# Altium PCB main.PcbDoc (part 2 of 2)
Units mm, origin at the board's own origin, x right, y up, seen from the top; angles counter-clockwise.
Board outline 90 x 95 mm, 4 copper layers (Top L1, GND L2, CLK L3, Bot GND L4), stack 1.59 mm thick; 88 components, 60 nets, 501 pads, 675 vias.
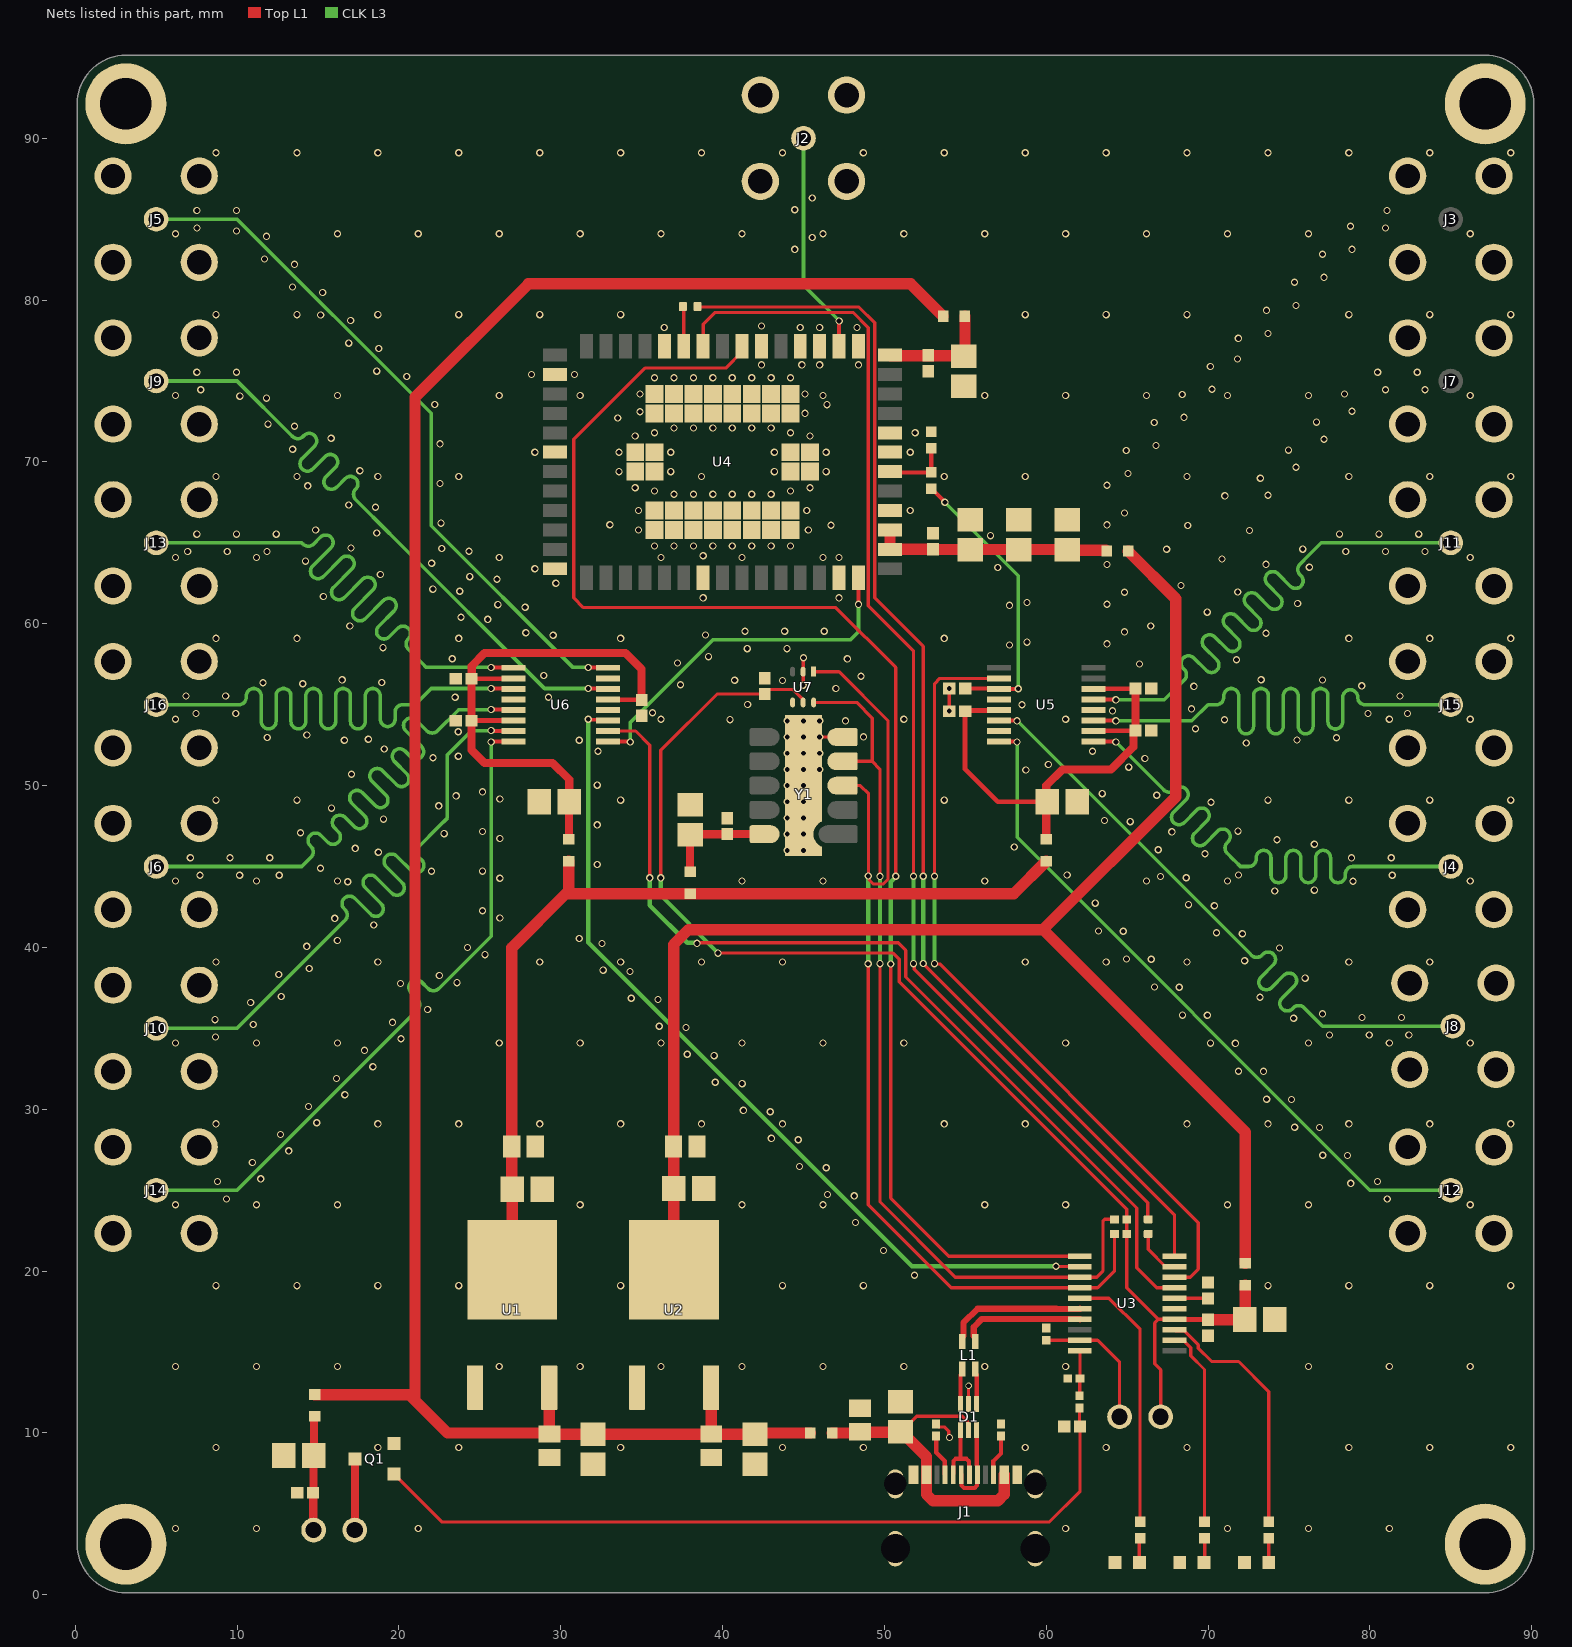
[diagram p4: the nets of this part, all layers, seen from the top]

## Via types
v1: diameter 0.45, hole 0.3, Top L1 to Bot GND L4, tented both sides, 674 vias
v2: diameter 0.4, hole 0.3, Top L1 to Bot GND L4, tented both sides, 1 vias

## Nets (pads, with @x,y where several pads share a name; then routed paths per layer and width w, separated by ;. In a path a pad name is that pad's centre, name@x,y a point inside that pad or via, vN(x,y) a via of type N, cw(c..) or ccw(c..) an arc to the next point about the centre after c; other vN are vias at no path point) (continued)
10MHz_3: J11.1 U5.13 | length 41.8
  Top L1 w0.248: U5.13@62.921,55.325 62.933,55.312 64.288,55.312 v1(64.3,55.3)
  CLK L3 w0.22: v1(64.3,55.3) 67.3,55.3 68.45,56.45 68.528,56.528 ccw(c68.203,56.853) 68.528,57.178 68.471,57.235 cw(c68.796,57.56) 68.471,57.885 cw(c68.796,57.56) 69.121,57.885 69.885,57.121 ccw(c70.21,57.446) 70.535,57.121 ccw(c70.21,57.446) 70.535,57.771 69.771,58.535 cw(c70.097,58.86) 69.771,59.186 cw(c70.097,58.86) 70.422,59.186 71.186,58.422 ccw(c71.511,58.747) 71.836,58.422 ccw(c71.511,58.747) 71.836,59.072 71.072,59.836 cw(c71.397,60.161) 71.072,60.486 cw(c71.397,60.161) 71.722,60.486 72.486,59.722 ccw(c72.811,60.047) 73.136,59.722 ccw(c72.811,60.047) 73.136,60.372 72.373,61.136 cw(c72.698,61.462) 72.373,61.787 cw(c72.698,61.462) 73.023,61.787 73.787,61.023 ccw(c74.112,61.348) 74.437,61.023 ccw(c74.112,61.348) 74.437,61.673 73.673,62.437 cw(c73.998,62.762) 73.673,63.087 cw(c73.998,62.762) 74.323,63.087 75.087,62.323 ccw(c75.412,62.648) 75.738,62.323 ccw(c75.412,62.648) 75.738,62.974 75.681,63.03 cw(c76.006,63.356) 75.681,63.681 76.2,64.2 77,65 J11.1@85,65
10MHz_4: J15.1 U5.11 | length 42.2
  Top L1 w0.248: U5.11@62.921,54.025 62.934,54.012 64.288,54.012 v1(64.3,54)
  CLK L3 w0.22: v1(64.3,54) 69,54 70,55 70.4,55 70.51,55 ccw(c70.51,55.46) 70.97,55.46 70.97,55.54 cw(c71.429,55.54) 71.889,55.54 71.889,53.662 ccw(c72.349,53.662) 72.809,53.662 72.809,55.54 cw(c73.269,55.54) 73.729,55.54 73.729,53.662 ccw(c74.188,53.662) 74.648,53.662 74.648,55.54 cw(c75.108,55.54) 75.568,55.54 75.568,53.662 ccw(c76.028,53.662) 76.487,53.662 76.487,55.54 cw(c76.947,55.54) 77.407,55.54 77.407,53.954 ccw(c77.867,53.954) 78.327,53.954 78.327,55.46 cw(c78.787,55.46) 79.246,55.46 ccw(c79.706,55.46) 79.706,55 80.6,55 J15.1@85,55
10MHz_5: J4.1 U5.9 | length 42.1
  Top L1 w0.248: U5.9@62.921,52.725 62.934,52.712 64.288,52.712 v1(64.3,52.7)
  CLK L3 w0.22: v1(64.3,52.7) 67.2,49.8 67.278,49.722 ccw(c67.603,50.047) 67.928,49.722 67.985,49.779 cw(c68.31,49.454) 68.635,49.779 cw(c68.31,49.454) 68.635,49.129 67.871,48.365 ccw(c68.196,48.04) 67.871,47.715 ccw(c68.196,48.04) 68.521,47.715 69.285,48.479 cw(c69.61,48.153) 69.936,48.479 cw(c69.61,48.153) 69.936,47.828 69.172,47.064 ccw(c69.497,46.739) 69.172,46.414 ccw(c69.497,46.739) 69.822,46.414 70.586,47.178 cw(c70.911,46.853) 71.236,47.178 cw(c70.911,46.853) 71.236,46.528 71.179,46.471 ccw(c71.504,46.146) 71.179,45.821 71.572,45.428 71.65,45.35 72,45 72.4,45 72.51,45 ccw(c72.51,45.46) 72.97,45.46 72.97,45.54 cw(c73.429,45.54) 73.889,45.54 73.889,44.46 ccw(c74.349,44.46) 74.809,44.46 74.809,45.54 cw(c75.269,45.54) 75.729,45.54 75.729,44.46 ccw(c76.188,44.46) 76.648,44.46 76.648,45.54 cw(c77.108,45.54) 77.568,45.54 77.568,44.46 ccw(c78.028,44.46) 78.487,44.46 78.487,44.54 cw(c78.947,44.54) 78.947,45 80.4,45 J4.1@85,45
10MHz_6: J8.1 U5.6 | length 41.9
  Top L1 w0.248: U5.6@57.079,54.025 57.092,54.012 58.188,54.012 v1(58.2,54)
  CLK L3 w0.22: v1(58.2,54) 72.6,39.6 72.678,39.522 ; 72.678,39.522 ccw(c73.003,39.847) 73.328,39.522 73.385,39.579 cw(c73.71,39.254) 74.035,39.579 cw(c73.71,39.254) 74.035,38.929 73.271,38.165 ccw(c73.596,37.84) 73.271,37.515 ccw(c73.596,37.84) 73.921,37.515 74.685,38.279 cw(c75.01,37.953) 75.336,38.279 cw(c75.01,37.953) 75.336,37.628 74.572,36.864 ccw(c74.897,36.539) 74.572,36.214 ccw(c74.897,36.539) 75.222,36.214 75.279,36.271 cw(c75.604,35.946) 75.929,36.271 76.672,35.528 76.75,35.45 77.073,35.127 J8.1@85.127,35.127
10MHz_7: J12.1 U5.8 | length 42.9
  Top L1 w0.248: U5.8@57.079,52.725 57.092,52.712 58.188,52.712 v1(58.2,52.7)
  CLK L3 w0.22: v1(58.2,52.7) 58.2,46.8 80,25 J12.1@85,25
10MHz_EN: U3.8 U5.2 | length 48.9
  Top L1 w0.2: v1(53.1,39) 53.121,38.979 53.421,38.979 69.4,23 69.4,20.124 68.901,19.625 U3.8@67.921,19.625 ; v1(53.1,44.4) 53.1,56.3 53.425,56.625 U5.2@57.079,56.625
  CLK L3 w0.254: v1(53.1,39) v1(53.1,44.4)
10MHz_ref: C25.1 R4.2 U5.3 | length 17.9
  Top L1 w0.248: R4.2@52.897,68.351 53.737,67.511 v1(53.737,67.504) ; C25.1@54.99,56 55.003,55.987 57.067,55.987 U5.3@57.079,55.975 57.085,55.981 58.263,55.981 v1(58.269,55.986)
  CLK L3 w0.22: v1(53.737,67.504) 58.269,62.972 v1(58.269,55.986)
10MHzOut_3V3: C21.1 C22.1 C26.1 C27.1 FB3.2 U5.5 U5.10 U5.14 | length 30.3
  Top L1 w0.3: U5.5@57.079,54.675 57.052,54.648 55.038,54.648 C22.1@54.99,54.6 54.99,51.01 57,49 C21.1@60.074,49 ; U5.10@62.921,53.375 62.933,53.387 65.497,53.387 C27.1@65.51,53.4 ; U5.14@62.921,55.975 62.933,55.987 65.497,55.987 C26.1@65.51,56
  Top L1 w0.5: FB3.2@60,46.675 60,48.926 C21.1@60.074,49 60,49.074 60,50 61,51 64,51 65.38,52.38 65.38,53.29 65.49,53.4 C27.1@65.51,53.4 C26.1@65.51,56
ANT_5V: C17.1 C18.1 FB7.2 U4.54 | length 7.1
  Top L1 w0.7: U4.54@50.35,76.6 50.387,76.563 54.863,76.563 C17.1@54.9,76.526 54.975,76.601 FB7.2@54.975,79
CLK_3V3: C2.1 C6.1 FB2.1 FB3.1 FB4.1 U1.2 | length 57.2
  Top L1 w0.7: U1.2@27,20.075 27.003,20.078 27.003,24.7 26.974,24.729 26.974,39.974 30.325,43.325 ; FB4.1@30.5,45.325 30.5,43.5 30.325,43.325 ; FB3.1@60,45.325 58,43.325 FB2.1@38,43.325 30.325,43.325
D_N: L1.3 U3.16 | length 8.8
  Top L1 w0.381: L1.3@54.8,15.65 54.8,15.9 54.882,15.983 54.882,16.804 55.754,17.676 60.633,17.676 60.641,17.668 62.071,17.668 U3.16@62.079,17.675
D_P: L1.2 U3.17 | length 7.7
  Top L1 w0.381: L1.2@55.6,15.65 55.6,15.9 55.517,15.983 55.517,16.541 56.018,17.041 60.37,17.041 60.378,17.033 62.071,17.033 U3.17@62.079,17.025
DIG_3V3: C4.1 C10.1 FB5.1 FB6.1 U2.2 | length 97.1
  Top L1 w0.5: FB5.1@65.075,64.475 FB5.1@65.075,64.5
  Top L1 w0.7: U2.2@37,20.075 36.974,20.101 C4.1@36.974,25.1 C10.1@36.974,27.7 36.974,40.174 37.9,41.1 59.8,41.1 ; FB5.1@65.075,64.475 68,61.55 68,49.3 59.8,41.1 ; FB6.1@72.3,20.475 72.3,28.6 59.8,41.1
GND: C1.2 C2.2 C3.2 C4.2 C5.2 C6.2 C7.2 C8.2 C9.2 C10.2 C11.2 C12.2 C13.2 C14.2 C15.2 C16.2 C17.2 C18.2 C19.2 C20.1 C21.2 C22.2 C23.2 C24.2 C25.2 C26.2 C27.2 C28.2 C29.2 C30.2 C31.2 C32.2 C33.2 C34.2 D1.2 DS1.2 DS2.2 DS3.2 J1.1 J1.2 J1.3 J1.4 J1.A1-B12 J1.B1-A12 J2.2 J2.3 J2.4 J2.5 J3.2 J3.3 J3.4 J3.5 J4.2 J4.3 J4.4 J4.5 J5.2 J5.3 J5.4 J5.5 J6.2 J6.3 J6.4 J6.5 J7.2 J7.3 J7.4 J7.5 J8.2 J8.3 J8.4 J8.5 J9.2 J9.3 J9.4 J9.5 J10.2 J10.3 J10.4 J10.5 J11.2 J11.3 J11.4 J11.5 J12.2 J12.3 J12.4 J12.5 J13.2 J13.3 J13.4 J13.5 J14.2 J14.3 J14.4 J14.5 J15.2 J15.3 J15.4 J15.5 J16.2 J16.3 J16.4 J16.5 pad.GND Q1.2 R1.2 R2.2 R5.1 R9.2 R14.2 U1.1 U2.1 U3.5 U4.1 U4.3 U4.4 U4.6 U4.11 U4.17 U4.21 U4.27 U4.34 U4.41 U4.46 U4.49 U4.50 U4.G01 U5.4 U5.7 U5.12 U6.4 U6.7 U6.12 U7.2 U7.4 Y1.5 Y1.11 | length 7.2
  Top L1 w0.2: v1(44.978,56.205) 44.989,56.216 44.989,57.889 v1(45,57.9) ; v1(46,53) Y1.5@47.6,53 ; R1.2@53.2,10.55 53.2,10.525 53.35,10.375 53.699,10.375 53.973,10.101 53.973,9.762 v1(54.021,9.714) ; v1(54.01,54.6) v1(54.01,56) ; D1.2@55.2,11.8 v2(55.199,12.916)
  other v1: 6.2,4.1 11.2,4.1 21.2,4.1 61.2,4.1 71.2,4.1 76.2,4.1 81.2,4.1 8.7,9.1 18.7,9.1 23.7,9.1 33.7,9.1 43.7,9.1 48.7,9.1 58.7,9.1 63.7,9.1 68.7,9.1 78.7,9.1 83.7,9.1 88.7,9.1 6.2,14.1 11.2,14.1 16.2,14.1 26.2,14.1 31.2,14.1 36.2,14.1 41.2,14.1 46.2,14.1 51.2,14.1 56.2,14.1 61.2,14.1 76.2,14.1 81.2,14.1 86.2,14.1 8.7,19.1 13.7,19.1 18.7,19.1 23.7,19.1 33.7,19.1 43.7,19.1 48.7,19.1 73.7,19.1 78.7,19.1 83.7,19.1 88.7,19.1 51.861,19.743 49.946,21.271 48.214,23.004 6.2,24.1 11.2,24.1 16.2,24.1 31.2,24.1 41.2,24.1 46.2,24.1 56.2,24.1 61.2,24.1 71.2,24.1 76.2,24.1 86.2,24.1 9.347,24.461 81.068,24.461 48.14,24.652 46.481,24.736 78.815,25.423 8.794,25.539 80.468,25.539 11.462,25.699 46.407,26.384 44.749,26.468 10.947,26.709 77.082,27.155 78.617,27.145 13.194,27.432 44.675,28.116 43.016,28.201 12.679,28.442 75.35,28.888 76.885,28.877 8.7,29.1 18.7,29.1 23.7,29.1 28.7,29.1 33.7,29.1 38.7,29.1 43.7,29.1 53.7,29.1 58.7,29.1 68.7,29.1 73.7,29.1 78.7,29.1 83.7,29.1 88.7,29.1 14.926,29.164 42.942,29.849 41.284,29.933 14.412,30.174 75.153,30.61 73.617,30.62 16.659,30.896 41.21,31.581 39.551,31.666 16.144,31.906 73.42,32.342 71.885,32.353 18.391,32.629 39.478,33.314 37.819,33.398 17.877,33.639 70.153,34.085 71.688,34.075 6.2,34.1 11.2,34.1 16.2,34.1 26.2,34.1 31.2,34.1 36.2,34.1 41.2,34.1 46.2,34.1 51.2,34.1 61.2,34.1 76.2,34.1 81.2,34.1 86.2,34.1 20.124,34.361 8.674,34.461 77.508,34.588 79.958,34.588 82.408,34.588 37.745,35.046 36.087,35.13 10.998,35.236 19.609,35.371 8.631,35.539 75.287,35.622 79.505,35.666 81.955,35.666 68.42,35.818 69.955,35.807 77.066,35.896 21.776,36.17 10.839,36.601 36.013,36.778 34.354,36.863 73.21,36.921 12.731,36.968 66.688,37.55 68.223,37.539 20.102,37.771 23.585,37.823 75.996,38.1 22.502,38.264 12.571,38.334 34.28,38.511 32.622,38.595 14.463,38.701 8.7,39.1 18.7,39.1 28.7,39.1 33.7,39.1 38.7,39.1 43.7,39.1 58.7,39.1 63.7,39.1 68.7,39.1 78.7,39.1 83.7,39.1 72.259,39.179 66.49,39.272 64.955,39.282 25.317,39.555 74.409,39.967 24.234,39.996 14.304,40.066 32.548,40.243 16.196,40.433 31.143,40.549 72.12,40.842 70.526,40.911 64.758,41.004 63.223,41.015 18.45,41.391 16.036,41.799 26.239,41.825 25.161,42.264 70.388,42.574 68.794,42.644 63.026,42.737 74.118,43.49 76.567,43.538 16.839,44.056 6.2,44.1 11.2,44.1 16.2,44.1 41.2,44.1 46.2,44.1 56.2,44.1 66.2,44.1 71.2,44.1 78.954,44.092 86.2,44.1 26.239,44.275 68.656,44.307 67.061,44.376 7.709,44.461 10.159,44.461 12.609,44.461 81.376,44.461 61.293,44.469 71.876,44.477 22.01,44.712 25.161,44.714 15.161,44.896 32.257,45.126 7.116,45.539 9.566,45.539 12.016,45.539 78.866,45.534 81.316,45.539 69.809,45.793 18.729,45.881 44,46 45,46 66.923,46.039 17.305,46.12 58.026,46.212 76.566,46.377 74.264,46.656 26.239,46.725 44,47 45,47 22.795,47.033 13.917,47.084 67.763,47.142 25.161,47.164 71.851,47.187 32.257,47.576 65.191,47.771 63.597,47.841 19.045,47.925 44,48 45,48 15.836,48.607 22.461,48.748 70.176,48.975 44,49 45,49 8.7,49.1 13.7,49.1 33.7,49.1 53.7,49.1 73.7,49.1 78.7,49.1 83.7,49.1 88.7,49.1 26.239,49.175 23.539,49.367 66.831,49.407 63.458,49.504 25.161,49.614 44,50 45,50 32.257,50.026 17.069,50.7 58.739,50.96 44,51 45,51 46,51 65.098,51.139 60.132,51.306 66.094,51.669 22.106,51.721 23.675,51.813 44,52 45,52 46,52 32.304,52.121 62.853,52.121 19.096,52.266 72.358,52.634 16.631,52.803 31.143,52.799 75.496,52.818 18.114,52.861 77.942,52.96 11.867,52.976 44,53 45,53 48.707,53.012 14.312,53.122 23.668,53.33 69.219,53.509 44,54 45,54 46,54 47.6,54 40.461,54.077 71.021,54.072 6.2,54.1 36.2,54.1 51.2,54.1 61.2,54.1 81.2,54.1 86.2,54.1 7.468,54.461 9.918,54.461 79.879,54.461 82.329,54.461 35.664,54.502 64.089,54.617 68.979,54.741 58.5,55 41.55,55.009 23.475,55.461 29.25,55.461 6.846,55.539 9.296,55.539 81.862,55.539 47,56 69.122,56.132 79.492,56.163 37.396,56.234 14.056,56.294 11.607,56.353 18.938,56.371 43.7,56.5 40.747,56.51 16.494,56.536 73.277,56.537 77.07,56.53 48.551,56.753 28.953,56.809 65.757,57.519 37.212,57.575 71.756,57.781 23.293,57.839 47.711,57.831 39.129,57.967 41.528,58.461 43.978,58.461 19.022,58.524 57.73,58.688 63.761,58.76 58.808,58.865 8.7,59.1 13.7,59.1 23.7,59.1 33.7,59.1 53.7,59.1 78.7,59.1 83.7,59.1 88.7,59.1 29.531,59.287 38.945,59.307 73.581,59.414 27.847,59.447 64.839,59.498 41.384,59.539 43.834,59.539 46.284,59.539 16.971,59.863 66.461,59.866 25.488,60.274 23.832,60.405 69.946,60.718 27.799,61.019 57.73,61.138 26.114,61.179 63.761,61.21 75.536,61.256 58.808,61.315 38.8,61.6 47.2,61.6 15.333,61.685 64.839,61.948 71.833,61.958 23.756,62.006 22.1,62.138 68.322,62.364 29.7,62.5 26.066,62.752 24.382,62.912 18.854,63.042 28.4,63.4 57.001,63.478 76.257,63.494 63.761,63.66 73.586,63.67 22.023,63.739 14.223,63.869 70.861,64.005 6.2,64.1 11.2,64.1 26.2,64.1 36.2,64.1 41.2,64.1 46.2,64.1 47.2,64.1 86.2,64.1 38.8,64.2 6.945,64.461 9.395,64.461 11.845,64.461 78.508,64.461 80.958,64.461 83.408,64.461 24.334,64.484 67.44,64.602 75.848,64.61 22.65,64.644 17.034,64.682 35.8,64.8 37,64.8 38.2,64.8 39.4,64.8 40.6,64.8 41.8,64.8 43,64.8 44.2,64.8 56.56,65.443 7.518,65.539 9.968,65.539 12.418,65.539 78.115,65.539 80.565,65.539 83.015,65.539 18.635,65.603 72.561,65.769 14.854,65.799 34.8,65.8 45.3,65.8 68.746,66.075 46.706,66.09 33.036,66.119 63.761,66.11 22.602,66.217 64.839,66.848 34.8,67 45.2,67 51.6,67 18.559,67.204 16.906,67.338 71.039,67.903 73.7,67.938 37,68 38.2,68 39.4,68 40.6,68 41.8,68 43,68 35.8,68.2 44.2,68.2 34.6,68.4 45.4,68.4 14.369,68.52 63.761,68.56 22.539,68.666 73.232,68.995 8.7,69.1 13.7,69.1 18.7,69.1 23.7,69.1 38.7,69.1 53.7,69.1 58.7,69.1 68.7,69.1 78.7,69.1 83.7,69.1 88.7,69.1 65.052,69.289 33.6,69.4 36.8,69.4 43.2,69.4 46.4,69.4 17.588,69.453 75.433,69.671 28.4,70.6 33.6,70.6 36.8,70.6 43.2,70.6 46.4,70.6 51.6,70.6 64.943,70.706 74.965,70.727 13.435,70.785 66.784,71.022 22.539,71.116 77.165,71.403 15.813,71.463 34.6,71.6 45.4,71.6 35.8,71.8 44.2,71.8 51.9,71.8 37,72.1 38.2,72.1 39.4,72.1 40.6,72.1 41.8,72.1 43,72.1 13.556,72.207 11.905,72.333 66.676,72.438 76.697,72.46 33.522,72.711 68.516,72.754 45.1,73 34.9,73.1 78.898,73.135 22.218,73.545 46.449,73.539 11.823,73.939 10.173,74.065 6.2,74.1 16.2,74.1 26.2,74.1 31.2,74.1 46.2,74.1 56.2,74.1 61.2,74.1 66.2,74.1 71.2,74.1 76.2,74.1 86.2,74.1 68.408,74.17 34.9,74.2 45.1,74.2 78.43,74.192 7.755,74.461 80.958,74.461 83.408,74.461 70.249,74.486 35.8,75.2 37,75.2 38.2,75.2 39.4,75.2 40.6,75.2 41.8,75.2 43,75.2 44.2,75.2 20.485,75.277 28.2,75.4 30.85,75.408 7.518,75.539 9.968,75.539 80.476,75.539 82.926,75.539 18.629,75.608 70.141,75.903 42.4,76 44.9,76 46,76 48.4,76 71.824,76.363 18.753,77.01 16.897,77.341 71.873,77.635 73.7,77.938 36.4,78.3 44.8,78.3 46,78.3 48.3,78.3 42.4,78.4 17.02,78.742 15.164,79.073 8.7,79.1 13.7,79.1 18.7,79.1 23.7,79.1 28.7,79.1 33.7,79.1 58.7,79.1 63.7,79.1 68.7,79.1 78.7,79.1 83.7,79.1 88.7,79.1 73.605,79.368 75.433,79.671 15.288,80.474 13.432,80.806 75.338,81.1 77.165,81.403 13.556,82.207 11.7,82.538 77.07,82.832 44.461,83.134 78.898,83.135 45.539,83.861 11.823,83.939 6.2,84.1 16.2,84.1 21.2,84.1 26.2,84.1 31.2,84.1 36.2,84.1 41.2,84.1 46.2,84.1 51.2,84.1 56.2,84.1 61.2,84.1 66.2,84.1 71.2,84.1 76.2,84.1 86.2,84.1 9.967,84.271 7.525,84.461 80.958,84.461 78.803,84.565 7.518,85.539 9.968,85.539 81.051,85.539 44.461,85.584 45.539,86.311 8.7,89.1 13.7,89.1 18.7,89.1 23.7,89.1 28.7,89.1 33.7,89.1 38.7,89.1 43.7,89.1 48.7,89.1 53.7,89.1 58.7,89.1 63.7,89.1 68.7,89.1 73.7,89.1 78.7,89.1 83.7,89.1 88.7,89.1
GPS_3V3: C13.1 C14.1 C15.1 C16.1 FB5.2 U4.44 U4.45 | length 14.6
  Top L1 w0.5: C16.1@52.995,64.605 C16.1@53,64.61 C16.1@53.018,64.592 ; C15.1@61.282,64.592 C15.1@61.3,64.574 C15.1@61.337,64.537 ; FB5.2@63.688,64.537 FB5.2@63.725,64.5
  Top L1 w0.7: U4.44@50.35,64.6 U4.45@50.35,65.8 ; U4.44@50.355,64.605 C16.1@52.995,64.605 ; C16.1@53.018,64.592 C15.1@61.282,64.592 ; C15.1@61.337,64.537 FB5.2@63.688,64.537
GPS_ANT: J2.1 U4.2 | length 13.7
  Top L1 w0.248: U4.2@47.204,77.166 v1(47.204,78.714)
  CLK L3 w0.22: J2.1@45,90 45,80.918 v1(47.204,78.714)
GPS_nRST: U3.11 U4.7 | length 90.6
  Top L1 w0.2: U4.7@41.2,77.15 41.2,76.8 40.2,75.8 35.2,75.8 30.8,71.4 30.8,61.6 31.4,61 47,61 50.7,57.3 v1(50.7,44.4) ; v1(50.391,38.981) 50.391,24.509 53.975,20.925 U3.11@62.079,20.925
  CLK L3 w0.254: v1(50.391,38.981) 50.391,44.038 50.7,44.347 v1(50.7,44.4)
GPS_UART_RXD: R3.1 U4.9 | length 74.5
  Top L1 w0.2: U4.9@38.8,77.15 38.8,78.5 39.539,79.239 48.061,79.239 49,78.3 49,61.1 51.8,58.3 v1(51.8,44.4) ; v1(51.8,39) 51.848,38.952 51.848,38.652 66.267,24.233 66.267,23.233 R3.1@66.3,23.2
  CLK L3 w0.254: v1(51.8,39) v1(51.8,44.4)
GPS_UART_TXD: R6.2 U3.10 | length 76.7
  Top L1 w0.2: R6.2@38.45,79.6 38.475,79.575 48.425,79.575 49.4,78.6 49.4,61.6 52.4,58.6 v1(52.4,44.4) ; v1@52.401,38.999 67.921,23.479 U3.10@67.921,20.925
  CLK L3 w0.254: v1(52.401,39.001) v1(52.4,44.4)
heater_CTL: R13.2 R14.1 U3.20 | length 2.8
  Top L1 w0.2: R13.2@62.056,12.295 62.069,12.308 62.069,13.339 R14.1@62.081,13.352 62.081,15.073 U3.20@62.079,15.075
heater_PWR: C31.1 C34.1 FB8.2 J18.1 | length 7.1
  Top L1 w0.5: J18.1@14.73,4 14.71,4.02 14.71,6.282 14.728,6.3 14.728,8.598 C31.1@14.726,8.6 14.763,8.637 14.763,10.988 FB8.2@14.8,11.025
heater_return: J18.2 Q1.3 | length 4.4
  Top L1 w0.5: J18.2@17.27,4 17.285,4.015 17.285,8.385 Q1.3@17.3,8.4
IN_5V: C1.1 C3.1 C5.1 C9.1 FB1.2 FB7.1 FB8.1 U1.3 U2.3 | length 135.8
  Top L1 w0.7: FB8.1@14.808,12.367 20.633,12.367 21,12 ; U1.3@29.29,12.8 29.295,12.795 29.295,9.931 C9.1@29.3,9.926 ; U2.3@39.29,12.8 39.295,12.795 39.295,9.931 C5.1@39.3,9.926 ; FB1.2@45.425,10 42.074,10 C1.1@42,9.926 C5.1@39.3,9.926 ; FB7.1@53.625,79 51.625,81 28,81 21,74 21,12 ; 21,12 23,10 29.226,10 C9.1@29.3,9.926 ; C9.1@29.3,9.926 C3.1@32,9.926 C5.1@39.3,9.926
LED1: R10.2 U3.15 | length 16.4
  Top L1 w0.2: U3.15@62.079,18.325 63.875,18.325 65.8,16.4 R10.2@65.8,4.5
LED2: R11.2 U3.2 | length 12.3
  Top L1 w0.2: U3.2@67.921,15.725 68.475,15.725 68.926,15.274 68.926,14.774 69.779,13.921 R11.2@69.779,4.507
LED3: R12.2 U3.3 | length 15.6
  Top L1 w0.2: U3.3@67.921,16.375 67.998,16.298 68.552,16.298 68.552,16.286 69.4,15.438 69.4,15.227 70.214,14.413 71.887,14.413 73.752,12.549 R12.2@73.752,4.507
MCU_3V3: C11.1 C12.1 C32.1 FB6.2 J17.2 R7.2 R8.2 U3.4 U7.5 | length 78.8
  Top L1 w0.2: v1(36.183,44.297) 36.183,52.183 39.657,55.657 C32.1@42.601,55.657 ; v1@39.721,39.652 50.536,39.652 50.922,39.266 50.922,37.878 64.975,23.825 R7.2@64.975,23.2 R8.2@64.975,22.3 64.975,18.975 66.925,17.025 ; C32.1@42.601,55.677 42.861,55.937 44.335,55.937 44.975,55.297 U7.5@44.975,55.137 ; J17.2@67.07,11 67.07,13.894 66.7,14.264 66.7,16.8 66.925,17.025 ; U3.4@67.921,17.025 66.925,17.025
  Top L1 w0.3: U3.4@67.921,17.025 67.939,17.007 69.982,17.007 C12.1@70,16.99
  Top L1 w0.7: C12.1@70,16.99 70.005,16.995 72.269,16.995 72.3,17.026 FB6.2@72.3,19.125
  CLK L3 w0.254: v1(36.183,44.297) 36.183,43.198 39.718,39.663 v1(39.718,39.649)
NetC30_1: C30.1 U3.6 | length 2.1
  Top L1 w0.2: U3.6@67.921,18.325 69.985,18.325 C30.1@70,18.31
NetC33_1: C33.1 Q1.1 R13.1 | length 49.6
  Top L1 w0.2: Q1.1@19.7,7.45 22.65,4.5 60.2,4.5 62.09,6.39 C33.1@62.09,10.4 62.056,10.434 R13.1@62.056,11.545
NetD1_1: D1.1 L1.1 | length 2.2
  Top L1 w0.26: L1.1@55.6,13.95 55.6,13.7 55.7,13.6 D1.1@55.7,11.8
NetD1_3: D1.3 L1.4 | length 2.2
  Top L1 w0.26: D1.3@54.7,11.8 54.7,13.6 54.8,13.7 L1.4@54.8,13.95
NetDS1_1: DS1.1 R10.1 | length 1.5
  Top L1 w0.2: DS1.1@65.75,2 65.75,3.45 R10.1@65.8,3.5
NetDS2_1: DS2.1 R11.1 | length 1.5
  Top L1 w0.2: DS2.1@69.75,2 69.791,2.041 R11.1@69.791,3.495
NetDS3_1: DS3.1 R12.1 | length 1.8
  Top L1 w0.2: DS3.1@73.752,1.739 R12.1@73.752,3.507
NetJ1_A5: J1.A5 R1.1 | length 2.6
  Top L1 w0.26: R1.1@53.2,9.8 53.2,8.8 53.73,8.27 53.73,7.445 J1.A5@53.75,7.425
NetJ1_B5: J1.B5 R2.1 | length 2.6
  Top L1 w0.254: 56.73,8.27 57.2,8.74 57.2,8.9
  Top L1 w0.26: 56.73,8.27 56.73,7.445 J1.B5@56.75,7.425 ; 57.2,8.9 R2.1@57.2,9.8
NetJ17_1: J17.1 R9.1 U3.19 | length 8.5
  Top L1 w0.2: R9.1@60,15.725 U3.19@62.079,15.725 63.175,15.725 64.53,14.37 J17.1@64.53,11
NetR3_2: R3.2 U3.9 | length 3
  Top L1 w0.2: R3.2@66.3,22.3 66.3,21.342 67.367,20.275 U3.9@67.921,20.275
NetR4_1: R4.1 R5.2 U4.48 | length 4.1
  Top L1 w0.254: U4.48@50.35,69.4 50.399,69.351 R4.1@52.897,69.351 R5.2@52.897,70.851
NetR6_1: R6.1 U4.10 | length 2.5
  Top L1 w0.2: R6.1@37.55,79.6 37.6,79.55 U4.10@37.6,77.15
OCXO_3V3: C19.1 C20.2 FB2.2 Y1.10 | length 6.8
  Top L1 w0.5: FB2.2@38,44.675 C19.1@38,46.974 38.018,46.992 40.282,46.992 C20.2@40.3,47.01 40.305,47.005 42.445,47.005 Y1.10@42.45,47
OCXO_SCL: R8.1 U3.14 U7.1 Y1.3 | length 64.4
  Top L1 w0.2: U7.1@45.625,57.038 47.202,57.038 50.221,54.019 50.221,44.209 49.93,43.918 49.318,43.918 49.05,44.186 49.05,44.36 v1(49.002,44.408) 49.025,44.431 49.025,49.49 48.515,50 Y1.3@48.175,50 Y1.3@47.6,50 ; v1(48.997,38.992) 48.997,24.103 54.125,18.975 U3.14@62.079,18.975 63.175,18.975 64.225,20.025 R8.1@64.225,22.3
  CLK L3 w0.254: v1(48.997,38.992) 48.999,38.994 48.999,44.405 v1(49.002,44.408)
OCXO_SDA: R7.1 U3.13 U7.6 Y1.4 | length 55.5
  Top L1 w0.2: U7.6@45.625,55.137 48.291,55.137 49.255,54.172 49.255,51.484 ; Y1.4@47.6,51.5 Y1.4@48.175,51.5 49.24,51.5 49.72,51.02 v1@49.72,44.406 ; v1(49.726,38.997) 49.726,24.274 54.375,19.625 U3.13@62.079,19.625 63.125,19.625 63.5,20 63.5,23.083 63.617,23.2 R7.1@64.225,23.2
  CLK L3 w0.254: v1(49.726,38.997) 49.73,39 49.73,44.39 v1(49.733,44.393)
PPS: U4.42 U6.1 | length 22.4
  Top L1 w0.248: U6.1@32.921,52.725 32.934,52.712 34.288,52.712 v1(34.3,52.7) ; v1(48.4,61.2) U4.42@48.4,62.85
  CLK L3 w0.22: v1(34.3,52.7) 34.3,53.9 39.4,59 47.9,59 48.4,59.5 v1(48.4,61.2)
PPS_1: J5.1 U6.8 | length 43.5
  Top L1 w0.248: v1(31.7,57.3) 31.713,57.287 32.909,57.287 U6.8@32.921,57.275
  CLK L3 w0.22: J5.1@5,85 10,85 22,73 22,66.056 30.756,57.3 v1(31.7,57.3)
PPS_2: J9.1 U6.6 | length 42.8
  Top L1 w0.248: v1(31.7,56) 31.713,55.987 32.909,55.987 U6.6@32.921,55.975
  CLK L3 w0.22: J9.1@5,75 10,75 13.35,71.65 13.428,71.572 ccw(c13.753,71.897) 14.078,71.572 14.135,71.629 cw(c14.46,71.304) 14.785,71.629 cw(c14.46,71.304) 14.785,70.979 14.021,70.215 ccw(c14.346,69.89) 14.021,69.565 ccw(c14.346,69.89) 14.671,69.565 15.435,70.329 cw(c15.76,70.003) 16.086,70.329 cw(c15.76,70.003) 16.086,69.678 15.5,69.092 ccw(c15.825,68.767) 15.5,68.442 ccw(c15.825,68.767) 16.15,68.442 16.679,68.971 cw(c17.004,68.646) 17.329,68.971 cw(c17.004,68.646) 17.329,68.321 ccw(c17.654,67.996) 17.329,67.671 19.422,65.578 19.5,65.5 29,56 v1(31.7,56)
PPS_3: J13.1 U6.9 | length 42.8
  Top L1 w0.248: v1(25.7,57.3) 25.713,57.287 27.067,57.287 U6.9@27.079,57.275
  CLK L3 w0.22: J13.1@5,65 14,65 14.078,64.922 ccw(c14.403,65.247) 14.728,64.922 15.15,65.344 cw(c15.475,65.019) 15.8,65.344 cw(c15.475,65.019) 15.8,64.694 14.671,63.565 ccw(c14.996,63.24) 14.671,62.915 ccw(c14.996,63.24) 15.321,62.915 16.451,64.044 cw(c16.776,63.719) 17.101,64.044 cw(c16.776,63.719) 17.101,63.394 15.972,62.264 ccw(c16.297,61.939) 15.972,61.614 ccw(c16.297,61.939) 16.622,61.614 17.751,62.743 cw(c18.076,62.418) 18.401,62.743 cw(c18.076,62.418) 18.401,62.093 17.272,60.964 ccw(c17.597,60.639) 17.272,60.314 ccw(c17.597,60.639) 17.923,60.314 19.052,61.443 cw(c19.377,61.118) 19.702,61.443 cw(c19.377,61.118) 19.702,60.792 18.754,59.844 ccw(c19.079,59.519) 18.754,59.194 ccw(c19.079,59.519) 19.404,59.194 19.93,59.72 cw(c20.255,59.395) 20.58,59.72 cw(c20.255,59.395) 20.58,59.07 ccw(c20.906,58.745) 20.58,58.42 21.372,57.628 21.45,57.55 21.7,57.3 v1(25.7,57.3)
PPS_4: J16.1 U6.11 | length 42.8
  Top L1 w0.248: v1(25.7,56) 25.713,55.987 27.067,55.987 U6.11@27.079,55.975
  CLK L3 w0.22: J16.1@5,55 10,55 10.11,55 ccw(c10.11,55.46) 10.57,55.46 10.57,55.54 cw(c11.029,55.54) 11.489,55.54 11.489,53.97 ccw(c11.949,53.97) 12.409,53.97 12.409,55.54 cw(c12.869,55.54) 13.329,55.54 13.329,53.97 ccw(c13.788,53.97) 14.248,53.97 14.248,55.54 cw(c14.708,55.54) 15.168,55.54 15.168,53.97 ccw(c15.628,53.97) 16.087,53.97 16.087,55.54 cw(c16.547,55.54) 17.007,55.54 17.007,53.97 ccw(c17.467,53.97) 17.927,53.97 17.927,55.54 cw(c18.387,55.54) 18.846,55.54 18.846,54.105 ccw(c19.306,54.105) 19.766,54.105 19.766,54.54 cw(c20.226,54.54) 20.226,55 21,55 21.4,55.4 22,56 v1(25.7,56)
PPS_5: J6.1 U6.13 | length 42.8
  Top L1 w0.248: v1(25.7,54.7) 25.712,54.688 27.067,54.688 U6.13@27.079,54.675
  CLK L3 w0.22: J6.1@5,45 14,45 14.5,45.5 14.578,45.578 ccw(c14.253,45.903) 14.578,46.228 14.523,46.283 cw(c14.848,46.608) 14.523,46.933 cw(c14.848,46.608) 15.173,46.933 15.604,46.503 ccw(c15.929,46.828) 16.254,46.503 ccw(c15.929,46.828) 16.254,47.153 16.021,47.386 cw(c16.346,47.711) 16.021,48.036 cw(c16.346,47.711) 16.671,48.036 17.236,47.472 ccw(c17.561,47.797) 17.886,47.472 ccw(c17.561,47.797) 17.886,48.122 17.089,48.918 cw(c17.415,49.243) 17.089,49.569 cw(c17.415,49.243) 17.74,49.569 18.536,48.772 ccw(c18.861,49.097) 19.186,48.772 ccw(c18.861,49.097) 19.186,49.422 18.335,50.274 cw(c18.66,50.599) 18.335,50.925 cw(c18.66,50.599) 18.985,50.925 19.837,50.073 ccw(c20.162,50.398) 20.487,50.073 ccw(c20.162,50.398) 20.487,50.723 19.723,51.487 cw(c20.049,51.812) 19.723,52.137 cw(c20.049,51.812) 20.374,52.137 20.744,51.766 ccw(c21.069,52.092) 21.394,51.766 ccw(c21.069,52.092) 21.394,52.417 20.42,53.391 cw(c20.745,53.717) 20.42,54.042 cw(c20.745,53.717) 21.07,54.042 21.731,53.381 ccw(c22.056,53.706) 22.381,53.381 23.666,54.666 23.7,54.7 v1(25.7,54.7)
PPS_6: J10.1 U6.15 | length 42.8
  Top L1 w0.248: v1(25.7,53.4) 25.712,53.388 27.067,53.388 U6.15@27.079,53.375
  CLK L3 w0.22: J10.1@5,35 10,35 16.6,41.6 16.678,41.678 ccw(c16.353,42.003) 16.678,42.328 16.621,42.385 cw(c16.946,42.71) 16.621,43.035 cw(c16.946,42.71) 17.271,43.035 18.25,42.056 ccw(c18.575,42.381) 18.901,42.056 ccw(c18.575,42.381) 18.901,42.706 17.921,43.685 cw(c18.247,44.01) 17.921,44.336 cw(c18.247,44.01) 18.572,44.336 19.551,43.356 ccw(c19.876,43.682) 20.201,43.356 ccw(c19.876,43.682) 20.201,44.007 19.222,44.986 cw(c19.547,45.311) 19.222,45.636 cw(c19.547,45.311) 19.872,45.636 20.757,44.751 ccw(c21.082,45.076) 21.407,44.751 ccw(c21.082,45.076) 21.407,45.402 21.23,45.579 cw(c21.555,45.904) 21.23,46.23 22.45,47.45 23,48 23,51.9 24.5,53.4 v1(25.7,53.4)
PPS_7: J14.1 U6.16 | length 42.8
  Top L1 w0.248: v1(25.7,52.7) 25.712,52.712 27.066,52.712 U6.16@27.079,52.725
  CLK L3 w0.22: J14.1@5,25 10,25 21.076,36.076 21.154,36.154 ccw(c20.829,36.479) 21.154,36.804 20.746,37.213 cw(c21.071,37.538) 20.746,37.863 cw(c21.071,37.538) 21.396,37.863 21.804,37.455 ccw(c22.129,37.78) 22.455,37.455 25.7,40.7 v1(25.7,52.7)
PPS_EN: U3.7 U6.2 | length 58.2
  Top L1 w0.2: U6.2@32.921,53.375 34.625,53.375 35.5,52.5 v1(35.5,44.3) ; v1(38.421,40.25) 38.454,40.284 50.857,40.284 51.325,39.816 51.325,38.175 65.6,23.9 65.6,20.2 66.825,18.975 U3.7@67.921,18.975
  CLK L3 w0.254: v1(35.5,44.3) 35.5,42.604 37.816,40.288 38.383,40.288 v1(38.421,40.25)
PPS_ref: U3.12 U6.3 | length 53.7
  Top L1 w0.2: v1(31.7,54.1) 31.738,54.063 32.884,54.063 U6.3@32.921,54.025 ; v1(60.6,20.3) 60.613,20.288 62.067,20.288 U3.12@62.079,20.275
  CLK L3 w0.254: v1(31.7,54.1) 31.7,40.304 51.704,20.3 v1(60.6,20.3)
PPSOut_3V3: C23.1 C24.1 C28.1 C29.1 FB4.2 U6.5 U6.10 U6.14 | length 36.1
  Top L1 w0.254: U6.14@27.066,54.012 U6.14@27.079,54.025
  Top L1 w0.3: C29.1@24.5,56.61 C29.1@24.49,56.6 27.054,56.6 U6.10@27.079,56.625 ; C24.1@24.502,54.012 U6.14@27.066,54.012 ; U6.5@32.921,55.325 32.939,55.307 34.983,55.307 C28.1@35,55.29
  Top L1 w0.5: C29.1@24.49,56.6 C24.1@24.49,54 24.49,52.21 25.3,51.4 29.5,51.4 30.526,50.374 C23.1@30.526,49 30.513,48.987 30.513,46.688 FB4.2@30.5,46.675 ; C29.1@24.5,56.61 24.5,57.4 25.3,58.2 34,58.2 35,57.2 C28.1@35,55.29
USB_5V: C7.1 C8.1 D1.5 FB1.1 J1.A4-B9 J1.B4-A9 | length 20.3
  Top L1 w0.2: C7.1@51,10.074 51.051,10.074 52.002,11.025 54.804,11.025 55.15,10.679 55.15,10.24 D1.5@55.2,10.19
  Top L1 w0.5: FB1.1@46.775,10 FB1.1@46.812,10.037
  Top L1 w0.7: FB1.1@46.781,9.994 48.42,9.994 C8.1@48.5,10.074 ; C8.1@48.5,10.037 C7.1@50.963,10.037 ; C7.1@51.051,10.074 52.6,8.525 J1.A4-B9@52.6,7.425 52.6,6.2 53,5.8 57,5.8 57.4,6.2 J1.B4-A9@57.4,7.425
USB_D_N: D1.4 J1.A7 J1.B7 | length 4.5
  Top L1 w0.26: J1.B7@54.23,7.445 54.27,7.485 54.27,8.27 54.4,8.4 54.65,8.4 ; D1.4@54.7,10.19 54.7,8.45 54.65,8.4 ; J1.A7@55.23,7.445 55.23,8.248 55.078,8.4 54.65,8.4
USB_D_P: D1.6 J1.A6 J1.B6 | length 5.2
  Top L1 w0.26: J1.A6@54.75,7.425 54.77,7.405 54.77,6.754 54.922,6.601 55.578,6.601 55.73,6.754 55.73,7.405 J1.B6@55.75,7.425 55.75,7.864 55.744,7.87 55.744,7.972 55.7,8.016 D1.6@55.7,10.19
pads on no net: J1.A8 J1.B8 U1. U2. U3.1 U3.18 U4.5 U4.8 U4.12 U4.13 U4.14 U4.15 U4.16 U4.18 U4.19 U4.20 U4.22 U4.23 U4.24 U4.25 U4.26 U4.28 U4.29 U4.30 U4.31 U4.32 U4.33 U4.35 U4.36 U4.37 U4.38 U4.39 U4.40 U4.43 U4.47 U4.51 U4.52 U4.53 U7.3 Y1.1 Y1.2 Y1.7 Y1.8 Y1.9

## Polygon pours and split planes (outlines as drawn)
GND on GND L2 "GND_L02_P001" (solid, pour order 1): 0,0 97.5,0 97.5,100 0,100
GND on CLK L3 "GND_L03_P002" (solid, pour order 2): 0,0 97.5,0 97.5,102.5 0,102.5
GND on Bot GND L4 "GND_L04_P003" (solid, pour order 3): 0,0 99.7,0 100,0.3 100,97.5 0,97.5
GND on Top L1 "GND_L01_P000" (solid, pour order 0): 0,0 99.7,0 99.7,99 99.6,98.9 0,98.9

## Other copper
GND L2:

## Silkscreen, mask and mechanical layers (free items; w line width, h text height)
Top Overlay:
  text "+5V 150mA max" at 51.254,90.854 h2
  text "GNSS ANT" at 24.454,89.254 h2
  text "15-50dB" at 53.554,86.854 h2
  text "1" at 10.254,85.254 h2
  text "1" at 79.254,85.254 h2
  text "2" at 79.254,75.254 h2
  text "2" at 10.254,74.446 h2
  text "3" at 10.254,65.254 h2
  text "3" at 79.254,65.254 h2
  text "4" at 10.254,55.254 h2
  text "4" at 79.254,55.254 h2
  text "5" at 10.254,45.254 h2
  text "5" at 79.254,45.254 h2
  text "SimpleClock" at 31.253,38.051 h5
  text "6" at 10.254,35.254 h2
  text "6" at 79.254,35.254 h2
  text "UNIT-00 PROTOTYPE" at 24.841,34.056 h5
  text "Albert" at 42.7,31.411 h3
  text "7" at 10.254,25.254 h2
  text "7" at 79.254,25.254 h2
  text "PPS" at 2.254,17.254 h2
  text "10MHz" at 80.254,17.254 h2
  text "LVCMOS" at 2.254,14.254 h1.52
  text "LVCMOS" at 80.254,14.254 h1.52
  text "50ohm" at 2.254,11.254 h1.52
  text "50ohm" at 80.254,11.254 h1.52
  text "PROG" at 68.254,10.254 h1.52
  text "GNSS" at 66.686,6.189 h1.52
  text "OCXO" at 73.455,5.311 h1.52
  text "RDY" at 61.254,5.254 h1.52
  text "USB 5V2A max" at 25.654,1.554 h2
  text "heater" at 12.354,1.454 h1.52
outline:
  the board outline again, w0.254

## Text inside footprints (layer, text, board x,y; h text height)
U3: Top 3D Body "*" at 67.172,16.044 h1.27 r180; Top Overlay "*" at 68.492,14.847 h1.27 r180
U4: Top Assembly "mosaic-G5" at 40,70 h1.2
U5: Top 3D Body "*" at 57.816,56.206 h1.27; Top Overlay "*" at 56.507,57.503 h1.27
U6: Top 3D Body "*" at 32.184,53.793 h1.27 r180; Top Overlay "*" at 33.493,52.497 h1.27 r180